# Altium PCB Transmitter_PCB.PcbDoc (part 3 of 3)
Units mil, origin at the board's own origin, x right, y up, seen from the top; angles counter-clockwise.
Board outline 1968.5 x 1968.5 mil, 2 copper layers (Top Layer, Bottom Layer), stack 57 mil thick; 93 components, 58 nets, 274 pads, 96 vias.
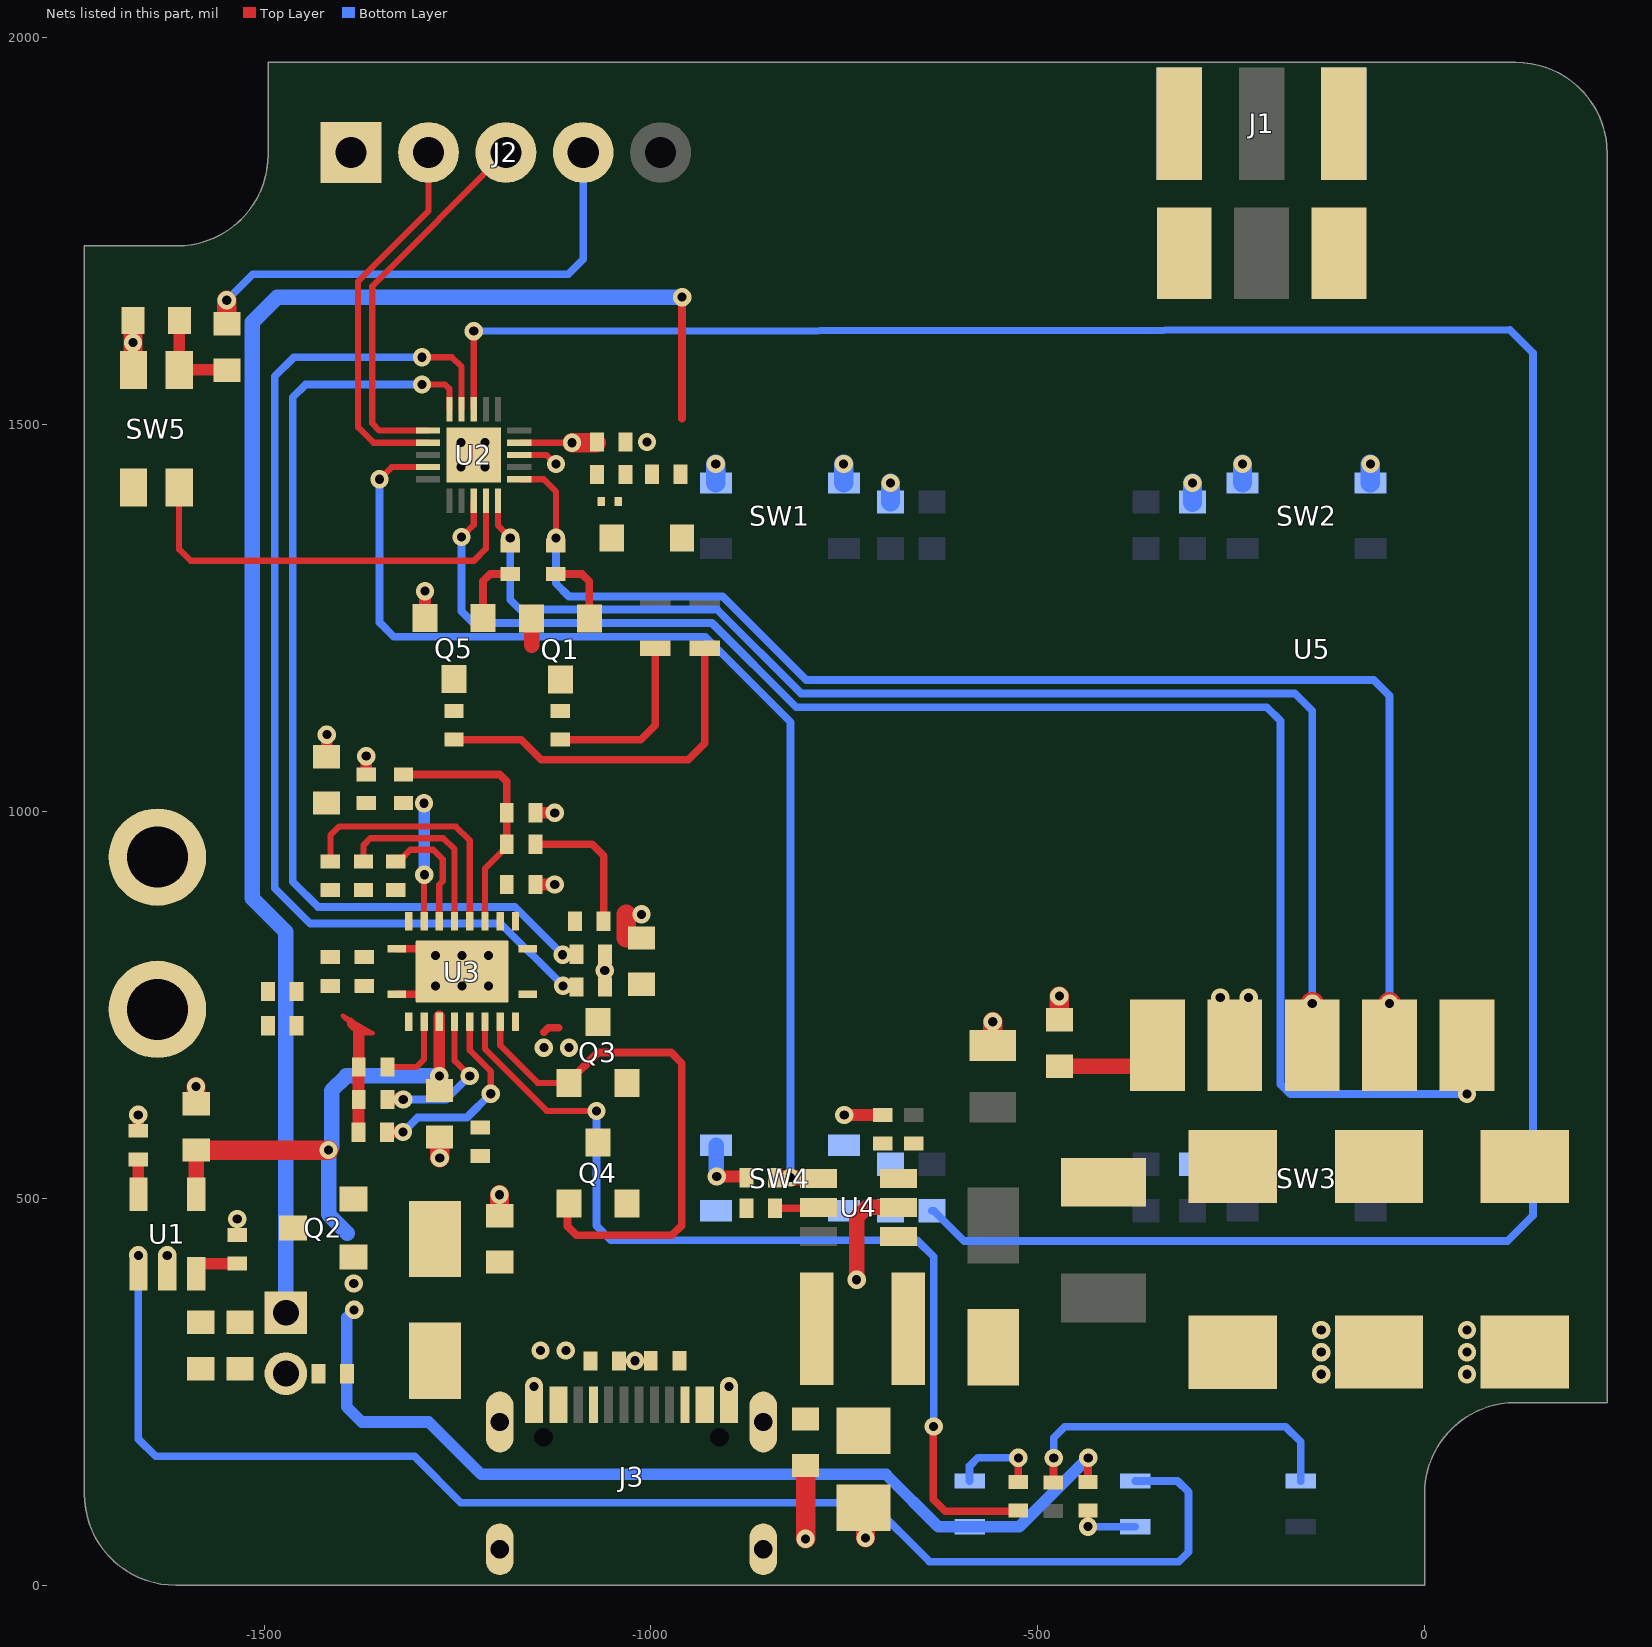
[diagram p2: the nets of this part, all layers, seen from the top]

## Via types
v1: diameter 23.62, hole 11.81, Top Layer to Bottom Layer, 96 vias

## Nets (pads, with @x,y where several pads share a name; then routed paths per layer and width w, separated by ;. In a path a pad name is that pad's centre, name@x,y a point inside that pad or via, vN(x,y) a via of type N, cw(c..) or ccw(c..) an arc to the next point about the centre after c; other vN are vias at no path point) (continued)
BUTTON4: C9.1 R5.2 SW4.1 SW4.2 U2.8 | length 3404.3
  Top Layer w8: U2.8@-1228.95,1520.1 v1(-1229,1621)
  Bottom Layer w10: v1(-1229,1621) 110.26,1622.79 140.36,1592.69 140.36,478.11 107.15,444.9 -594.95,444.9 -634.14,484.1 R5.2@-636.64,484.1
EN: R16.2 U2.14 U4.4 | length 1479.9
  Top Layer w6: U4.4@-784.17,526.83 U4.4@-783.17,525.83
  Top Layer w8: v1(-1350.78,1429.55) -1335.03,1445.29 U2.14@-1288.01,1445.29
  Top Layer w20: R16.2@-835.04,526.83 U4.4@-784.17,526.83
  Bottom Layer w10: v1(-1350.78,1429.55) -1350.78,1244.58 -1332.18,1225.98 -929.71,1225.98 -819.38,1115.65 v1(-819.38,527.05)
EN1: R28.2 U2.9 U3.10 | length 1397.9
  Top Layer w8: v1(-1295.91,1587.38) -1257.19,1587.38 -1244.7,1574.89 U2.9@-1244.7,1520.1
  Bottom Layer w10: v1(-1295.91,1587.38) -1461.26,1587.38 -1486,1562.64 -1486,901.15 -1440.14,855.29 -1193.98,855.29 v1(-1113.44,774.75)
EN2: R27.1 U2.10 U3.11 | length 1251.8
  Top Layer w8: v1(-1295.91,1552) -1265.93,1552 -1260.45,1546.52 U2.10@-1260.45,1520.1
  Bottom Layer w10: v1(-1295.91,1552) -1446.3,1552 -1462.77,1535.53 -1462.77,909.36 -1430.21,876.8 -1175.77,876.8 v1(-1114.02,815.04)
GND: C1.2 C2.2 C3.1 C4.1 C5.2 C6.2 C7.2 C8.2 C9.2 C10.2 C11.1 C12.1 C13.1 C14.1 C15.1 C16.1 C17.1 C18.1 C19.1 C20.2 C27.1 C28.1 C33.1 C34.2 C35.2 J1.2 J1.3 J1.4 J1.5 J2.1 J3.A1/B12 J3.B1/A12 J4.2 Q1.2 Q5.2 R13.1 R14.1 R15.2 R16.1 R17.2 R19.1 R21.1 R24.1 R25.2 R27.2 R28.1 SW1.3 SW1.4 SW2.3 SW2.4 SW3.3 SW3.4 SW4.3 SW4.4 SW5.2 U1.2 U2.3 U2.21 U3.1 U3.20 U3.21 U4.2 U5.2 U5.7 U5.8 | length 1121.4
  Top Layer w6: U3.21@-1288.91,763.8 v1(-1278.14,774.56) ; U3.21@-1286.87,822.86 v1(-1278.14,814.13)
  Top Layer w8: U2.3@-1169.9,1461.04 -1135.07,1461.04 -1123.25,1449.23 v1(-1122.74,1449.23)
  Top Layer w10: R13.1@-1662.53,587.63 R13.1@-1662.4,587.5 ; U3.1@-1328.54,763.8 U3.21@-1288.91,763.8 ; U3.20@-1328.54,822.86 U3.21@-1286.87,822.86 ; R16.1@-877.14,527.33 R16.1@-876.64,526.83
  Top Layer w15: R13.1@-1662.53,587.63 v1(-1662.53,608.05) ; R13.1@-1662.4,587.5 R13.1@-1662.35,587.55 ; v1(-1625.06,426.49) -1625,426.42 -1625,406 U1.2@-1624.94,405.94 ; v1(-1588.06,644.49) v1@-1588,644.42 ; v1(-1534.64,473.3) v1@-1534.58,473.24 ; C13.1@-1534.58,452.82 C13.1@-1534.51,452.75 ; C27.1@-1418.99,1070.96 -1418.89,1071.06 -1418.89,1099.41 v1(-1418.8,1099.51) ; C28.1@-1367.99,1048 C28.1@-1367.99,1048 v1@-1367.96,1071.64 ; Q5.2@-1291.89,1250.45 v1(-1291.89,1285) ; v1(-1272.95,552.38) v1(-1272.95,552.38) ; Q1.2@-1154.5,1247.3 Q1.2@-1154.15,1246.95 ; -1154.15,1214.93 -1153.89,1214.68 ; R25.2@-1149.29,905.73 v1(-1124.29,905.73) ; R24.1@-1149.29,998.37 v1(-1124.29,998.37) ; v1(-914.92,528.33) -877.16,528.33 -876.65,527.82 R16.1@-877.14,527.33 ; v1(-750,607.9) R19.1@-700.36,607.9 ; v1@-722.6,61.08 v1(-722.53,61.01) ; v1@-1367.96,1071.64 v1(-1367.92,1071.67)
  Top Layer w20: -1154.15,1214.93 Q1.2@-1154.15,1246.95 ; v1(-734,395) -734,475.14 -720.72,488.42 U4.2@-680.02,488.42
  Top Layer w25: C6.2@-1669.24,1634.63 C6.2@-1669.24,1634.63 -1669.32,1571.12 SW5.2@-1668.77,1570.57 ; C11.1@-1588,624 v1@-1588,644.42 ; v1(-1272.95,552.38) C17.1@-1273.02,572.87 ; C19.1@-1195.68,484.24 v1@-1195.68,504.66 ; -1031.97,836.73 -1031.97,867.2 ; v1(-800,60) -800,152.5 R21.1@-799.6,152.5 ; v1@-722.6,61.08 C16.1@-722.6,81.5 ; C15.1@-558.08,697.9 v1(-558.08,728.37) ; C1.2@-472,731 v1(-472,761.47)
  Bottom Layer w10: SW1.3@-916.17,1425.08 SW1.3@-915.84,1424.74 ; SW4.3@-915.85,568.74 SW4.3@-915.58,569.01 ; SW1.4@-750.81,1425.08 SW1.4@-750.48,1424.74 ; C5.2@-690.33,1400.43 C5.2@-690,1400.1 ; SW2.3@-235.3,1425.08 SW2.3@-234.97,1424.74 ; SW2.4@-69.94,1425.08 SW2.4@-69.61,1424.74
  Bottom Layer w20: SW4.3@-915.58,569.01 -915.27,568.7 -915.27,528.69 v1(-914.92,528.33)
  Bottom Layer w25: SW1.3@-916.17,1425.08 v1(-916.17,1449.39) ; SW1.4@-750.81,1425.08 v1(-750.81,1449.39) ; C5.2@-690.33,1400.43 v1(-690.33,1424.74) ; C7.2@-300,1400.1 v1@-300,1424.41 ; SW2.3@-235.3,1425.08 v1(-235.3,1449.39) ; SW2.4@-69.94,1425.08 v1(-69.94,1449.39)
  other v1: -1150.98,257.13 -899.02,257.13 -133.41,272.75 55,272.75 -1020.53,290.25 -133.41,301.38 55,301.38 -133.41,330 55,330 -1195.74,504.73 -264,759.64 -227.38,759.64 -1243.89,774.56 -1209.64,774.56 -1059.59,794.68 -1243.89,814.13 -1209.64,814.13 -1011.97,867.2 -300,1424.74 -1245.46,1445.29 -1214.21,1445.29 -1245.46,1476.92 -1214.21,1476.92 -1005.1,1477.81 -1669.32,1606.15
ILIM: R18.2 R23.2 R24.2 U3.14 | length 329.9
  Top Layer w8: U3.14@-1214.36,858.29 -1214.36,926.64 R23.2@-1190.84,950.16
  Top Layer w10: R18.2@-1319.68,1048 -1195.29,1048 -1186.29,1039 R24.2@-1186.29,998.37 R23.2@-1186.29,957.66 R23.2@-1186.29,954.16 ; R23.2@-1190.84,950.16 -1190.29,950.16 -1186.57,953.89 R23.2@-1186.57,954.44
NetC1_1: C1.1 C10.1 C34.1 C35.1 D3.1 U5.1 | length 138.1
  Top Layer w10: U5.1@-372.38,671 U5.1@-345.2,698.18
  Top Layer w20: C1.1@-472,671 U5.1@-372.38,671
NetC3_2: C3.2 C4.2 L1.2 U2.4 | length 100.7
  Top Layer w8: U2.4@-1169.9,1476.79 v1(-1102,1476.79)
  Top Layer w10: C3.2@-1070.6,1476.79 C3.2@-1069.58,1477.81
  Top Layer w25: v1(-1102,1476.79) C3.2@-1070.6,1476.79
NetC16_2: C16.2 J3.S1 J3.S2 J3.S3 J3.S4 R21.2
NetC21_1: C21.1 C22.1 C23.1 C24.2 C25.2 C26.2 C32.2 U3.2 | length 227.6
  Top Layer w6: -1387.57,730.84 -1387.57,725.45 -1398.26,736.14 -1387.98,730.14 -1384.48,728.09 -1359.38,713.43 -1374.89,713.43 -1376.7,711.62
  Top Layer w10: -1387.57,725.45 -1377.59,715.47
  Top Layer w15: C22.1@-1377.88,585.6 -1377.88,627.8 C23.1@-1377.88,669.84 ; C23.1@-1377.59,669.84 -1377.59,715.47
NetC21_2: C21.2 U3.5 | length 197.5
  Top Layer w8: U3.5@-1253.73,728.37 -1253.73,678.05 v1(-1234.05,658.37)
  Top Layer w10: C21.2@-1340.64,627.85 C21.2@-1340.51,627.98
  Top Layer w15: C21.2@-1340.64,627.85 C21.2@-1340.59,627.8 ; C21.2@-1340.51,627.98 v1(-1320.09,627.98)
  Bottom Layer w10: v1(-1320.09,627.98) -1264.44,627.98 v1(-1234.05,658.37)
NetC22_2: C22.2 U3.6 | length 258.9
  Top Layer w8: U3.6@-1234.05,728.37 -1234.05,691.27 -1206.97,664.19 v1(-1206.97,635.33)
  Top Layer w10: C22.2@-1340.94,585.65 C22.2@-1340.81,585.78
  Top Layer w15: C22.2@-1340.94,585.65 C22.2@-1340.88,585.6 ; C22.2@-1340.81,585.78 v1(-1320.39,585.78)
  Bottom Layer w10: v1(-1320.39,585.78) -1301.55,604.61 -1237.69,604.61 v1(-1206.97,635.33)
NetC23_2: C23.2 U3.3 | length 102.5
  Top Layer w8: C23.2@-1342.86,669.84 -1302.97,669.84 -1293.1,679.7 U3.3@-1293.1,728.37
NetC24_1: C24.1 C25.1 L3.2
NetC26_1: C26.1 C29.1 C30.1 C31.1 C32.1 L3.1 U3.19
NetC29_2: C29.2 U3.17 | length 153.9
  Top Layer w8: C29.2@-1329.68,935.54 -1324.68,940.54 -1321.02,940.54 -1310.93,950.63 -1281.2,950.63 -1269.09,938.51 -1269.09,909.89 -1273.42,905.56 U3.17@-1273.42,858.29
NetC30_2: C30.2 U3.15 | length 330.6
  Top Layer w8: C30.2@-1414.27,935.54 -1414.27,969.49 -1403.13,980.63 -1251.99,980.63 -1234.05,962.69 U3.15@-1234.05,858.29
NetC31_2: C31.2 U3.16 | length 241.4
  Top Layer w8: C31.2@-1371.42,935.54 -1371.42,956.76 -1362.55,965.63 -1268.3,965.63 -1253.73,951.06 U3.16@-1253.73,858.29
NetD1_2: D1.2 L2.2 U4.1
NetD4_1: D4.1 L1.1
NetJ3_A5: J3.A5 R15.1
NetJ3_B5: J3.B5 R17.1
NetLED1_2: LED1.2 R9.1 | length 229.9
  Top Layer w10: R9.1@-1117,1093 -1012.94,1093 -994.44,1111.5 LED1.2@-994.44,1211.16
NetLED2_1: LED2.1 R10.1 | length 81.7
  Top Layer w10: v1(-435,75.78) R10.1@-435,96.5
  Bottom Layer w10: v1(-435,75.78) LED2.1@-374,75.79
NetLED2_2: LED2.2 U1.1 | length 1838.7
  Top Layer w15: v1(-1662.47,426.49) -1662.4,426.42 -1662.4,406 U1.1@-1662.34,405.94
  Bottom Layer w10: v1(-1662.47,426.49) -1662.47,189.04 -1640.06,166.63 -1305.55,166.63 -1245.69,106.77 -716.05,106.77 -639.75,30.47 -317.74,30.47 -305,43.21 -305,120.52 -319.33,134.84 LED2.2@-374,134.84
NetLED3_2: LED3.2 R26.1 | length 466.5
  Top Layer w10: R26.1@-1254.49,1093 -1167.55,1093 -1141.55,1067 -951.73,1067 -930.44,1088.29 LED3.2@-930.44,1211.16
NetLED4_2: LED4.2 R7.1 | length 441.8
  Top Layer w10: R7.1@-480,133 -479.62,133.38 -479.62,164.25 v1(-479.25,164.62)
  Bottom Layer w10: v1(-479.25,164.62) -479.25,190.75 -465,205 -179.69,205 -160,185.31 LED4.2@-160,134.84
NetLED5_2: LED5.2 R29.1 | length 117.9
  Top Layer w10: R29.1@-525,133.5 v1(-525,164.7)
  Bottom Layer w10: LED5.2@-588,134.84 -588,154.14 -577.44,164.7 v1(-525,164.7)
NetQ1_1: Q1.1 R6.1 | length 95.4
  Top Layer w10: R6.1@-1122.74,1307.15 -1089.09,1307.15 -1079.6,1297.66 Q1.1@-1079.6,1249.37
NetQ1_3: Q1.3 R9.2
NetQ3_1: Q3.1 Q4.1 U3.8 | length 706.6
  Top Layer w8: U3.8@-1194.68,728.37 -1194.68,697.88 -1146.12,649.33 Q3.1@-1105.77,649.33
  Top Layer w10: Q4.1@-1105.77,493.63 -1107.63,491.77 -1107.63,463.76 -1096.15,452.27 -972.78,452.27 -960,465.05 -960,674.87 -973.83,688.7 -1068.37,688.7 -1105.77,651.3 Q3.1@-1105.77,649.33
NetQ3_2: Q3.2 Q4.2
NetQ5_1: Q5.1 R12.1 | length 86.5
  Top Layer w10: Q5.1@-1217.09,1250.25 -1217.09,1297.67 -1207.61,1307.15 R12.1@-1181.9,1307.15
NetQ5_3: Q5.3 R26.2
NetR11_1: R11.1 R19.2 U4.3
NetR13_2: R13.2 U1.5 | length 45.3
  Top Layer w15: U1.5@-1662.4,505.18 R13.2@-1662.4,550.5
NetR22_1: R22.1 U3.12
NetR22_2: R22.2 R23.1 | length 181.3
  Top Layer w10: R23.1@-1149.29,957.66 -1075.79,957.66 -1060.97,942.84 R22.2@-1060.97,855.97
NetR25_1: R25.1 U3.13
POWER: R29.2 U3.7 | length 1243.7
  Top Layer w8: U3.7@-1214.36,728.37 -1214.36,693.01 -1134.53,613.18 v1(-1070.29,613.18)
  Top Layer w10: v1(-634.47,205.17) -635,204.64 -635,111.31 -619.44,95.75 -525.75,95.75 R29.2@-525,96.5
  Bottom Layer w10: v1(-1070.29,613.18) -1070.29,464.57 -1051.75,446.04 -656.01,446.04 -634.47,424.5 v1(-634.47,205.17)
RECT: C27.2 C28.2 R18.1 U3.18 | length 152.4
  Top Layer w8: U3.18@-1293.1,858.29 v1@-1293.1,918.14
  Bottom Layer w10: v1(-1293.1,1010.87) v1@-1292.93,1010.7 ; v1@-1292.93,918.65 v1(-1292.76,918.48)
  Bottom Layer w15: v1@-1292.93,918.65 v1@-1292.93,1010.7
RESET: C6.1 R2.2 SW5.1 U2.19 | length 678.4
  Top Layer w8: SW5.1@-1609.72,1419 -1609.72,1339.17 -1594.78,1324.24 -1228.6,1324.24 -1213.21,1339.63 U2.19@-1213.21,1401.99
  Top Layer w15: SW5.1@-1609.72,1570.57 C6.1@-1609.72,1634.16 ; SW5.1@-1609.24,1571.05 R2.2@-1545.66,1571.05
RESET#: J2.4 R2.1 | length 651.3
  Top Layer w25: R2.1@-1548.13,1630.49 v1(-1548.13,1660.96)
  Bottom Layer w10: v1(-1548.13,1660.96) -1514.46,1694.62 -1106.64,1694.62 -1087.37,1713.9 J2.4@-1087.37,1852
RX: R12.2 U2.20 U5.3 | length 1663.7
  Top Layer w8: U2.20@-1197.46,1401.99 -1197.46,1369.62 v1(-1181.71,1353.87)
  Top Layer w30: U5.3@-145.2,698.18 v1(-145.2,751.84)
  Bottom Layer w10: v1@-1181.71,1354.83 -1181.71,1273.83 -1168.98,1261.1 -914.25,1261.1 -805.93,1152.78 -167.79,1152.78 -145.2,1130.19 v1(-145.2,751.84)
RXD: J2.3 U2.11 | length 497.7
  Top Layer w8: U2.11@-1288.01,1492.54 -1350.78,1492.54 -1360.19,1501.95 -1360.19,1679.18 J2.3@-1187.37,1852
SET: U2.18 U5.5 | length 1982.8
  Top Layer w8: v1(-1244.7,1354.83) -1228.95,1370.58 U2.18@-1228.95,1401.99
  Bottom Layer w10: v1(-1244.7,1354.83) -1244.7,1258.85 -1229.62,1243.77 -920.96,1243.77 -812.19,1135 -203.88,1135 -186.09,1117.21 -186.09,647.71 -173.37,635 v1(55,635)
TX: R6.2 U2.1 U5.4 | length 1761.7
  Top Layer w8: U2.1@-1169.9,1429.55 -1138.49,1429.55 -1122.74,1413.8 v1(-1122.74,1353.87)
  Top Layer w30: U5.4@-45.2,698.18 v1(-45.2,751.84)
  Bottom Layer w10: v1(-1122.74,1353.87) -1122.74,1295.02 -1105.82,1278.1 -907.21,1278.1 -799.27,1170.16 -65.76,1170.16 -45.2,1149.6 v1(-45.2,751.84)
TXD: J2.2 U2.12 | length 491.7
  Top Layer w8: U2.12@-1288.01,1476.79 -1358.37,1476.79 -1378.5,1496.92 -1378.5,1685.24 -1287.37,1776.37 J2.2@-1287.37,1852
VBAT: C2.1 C12.2 C13.2 C33.2 D4.2 J4.1 Q2.3 U1.3 | length 2078.6
  Top Layer w10: -959.82,1507.98 -959.82,1664.71 v1(-959.53,1665)
  Top Layer w15: U1.3@-1587.6,415.82 C13.2@-1534.58,415.82
  Top Layer w25: D4.2@-960.61,1354.47 D4.2@-959.82,1353.68
  Bottom Layer w20: J4.1@-1471.79,352.25 -1471.79,844.65 -1515.03,887.89 -1515.03,1632.82 -1482.85,1665 v1(-959.53,1665)
VCC: C11.2 C17.2 C18.2 D2.2 LED5.1 Q2.1 Q4.3 R10.2 R14.2 U1.4 U3.4 | length 1882.7
  Top Layer w10: D2.2@-1295.75,273.51 D2.2@-1279,290.26 ; R10.2@-435,133.5 -434.85,133.64 -434.85,164.56 v1(-434.71,164.7)
  Top Layer w15: v1(-1273.42,658.37) U3.4@-1273.42,728.37 U3.4@-1273.42,735.72
  Top Layer w20: U1.4@-1587.6,505.18 C11.2@-1587.6,550.5
  Top Layer w25: C11.2@-1587.45,557.35 C11.2@-1582.31,562.5 ; C11.2@-1582.6,562.5 v1(-1416.55,562.5)
  Bottom Layer w15: v1(-1383.5,356) -1393.33,346.17 -1393.33,230.9 -1373.5,211.06 -1287.04,211.06 -1219.25,143.27 -695.99,143.27 -628.5,75.79 LED5.1@-588,75.79 -523.62,75.79 v1(-434.71,164.7)
  Bottom Layer w20: -1392.5,455.24 -1416.55,479.28 v1(-1416.55,562.5) -1412.54,566.51 -1412.54,639.4 -1393.57,658.37 v1(-1273.42,658.37)
  other v1: -1384.05,390.02
VCC#: C14.2 C19.2 D2.1 L2.1 Q2.2 U4.5 | length 98.7
  Top Layer w6: U4.5@-784.17,487.42 U4.5@-783.17,488.42
  Top Layer w10: D2.1@-1279,447.74 -1279,446.2 D2.1@-1250.54,417.74 ; C14.2@-839.64,487.42 U4.5@-784.17,487.42
VUSB: C20.1 J3.A4/B9 J3.B4/A9 Q3.3 U3.9 | length 21.4
  Top Layer w10: -1138.28,714.96 -1132.54,720.7 -1119.29,720.7
  other v1: -1142.6,303.57 -1109.9,303.57 -1138.28,694.96 -1105.77,694.96
pads on no net: J3.A6 J3.A7 J3.A8 J3.B6 J3.B7 J3.B8 J3.MH U2.2 U2.15 U2.16 U2.17 U4.6

## Polygon pours and split planes (outlines as drawn)
VUSB on Bottom Layer "VUSB_L02_P005" (solid, pour order 5): -1151.23,283.97 -1079.59,283.97 -1079.59,549.59 -1079.59,709.25 -1151.23,709.25
GND on Bottom Layer "GND_L02_P010" (solid, pour order 10): -1732.28,118.11 -1732.28,1731.28 -1614.5,1731.28 -1612.68,1731.28 ccw(c-1612.68,1849.39) -1494.57,1849.39 -1494.57,1968.5 118.11,1968.5 cw(c118.11,1850.39) 236.22,1850.39 236.22,236.22 119.94,236.22 118.11,236.22 ccw(c118.11,118.11) 0,118.11 0,0 -1614.17,0 cw(c-1614.17,118.11)
GND on Top Layer "GND_L01_P012" (solid, pour order 12): -1732.28,118.11 -1732.28,1731.28 -1614.5,1731.28 -1612.68,1731.28 ccw(c-1612.68,1849.39) -1494.57,1849.39 -1494.57,1968.5 118.11,1968.5 cw(c118.11,1850.39) 236.22,1850.39 236.22,236.22 119.94,236.22 118.11,236.22 ccw(c118.11,118.11) 0,118.11 0,0 -1614.17,0 cw(c-1614.17,118.11)
VUSB on Top Layer "VUSB_L01_P015" (solid, pour order 15): -1179.72,746.18 -994.47,746.18 -994.47,679.7 -1179.72,679.7
VCC on Top Layer "VCC_L01_P014" (solid, pour order 14): -1290.92,674.87 -1052.23,674.87 -1052.23,554.6 -1290.92,554.6
+5V on Top Layer "+5V_L01_P013" (solid, pour order 13): -340.35,1405 -340.35,1445 -775,1445 -775,1891.37 -1030,1891.37 -1030,1812.63 -865,1812.63 -865,1284.69 -1014.12,1284.69 -1014.12,1243.77 -1011.03,1240.69 -672.85,1240.69 -672.85,607.9 -600,607.9 -600,1405
VUSB on Top Layer "VUSB_L01_P006" (solid, pour order 6): -1107.68,277.49 -1094.73,290.44 -1094.73,320 -1159,320 -1159,267.66 -1131.3,239.96 -1131.3,140.45 -1104.85,114 -946.51,114 -918.7,141.81 -918.7,257.13 -942.32,257.13 -942.32,174.69 -962.01,155 -1087.65,155 -1107.68,175.02
VCC on Top Layer "VCC_L01_P007" (solid, pour order 7): -1402.16,440.56 -1402.16,241.05 -1245.54,241.05 -1245.54,339.47 -1365.94,339.47 -1365.94,440.56
NetC16_2 on Top Layer "NETC16_2_L01_P009" (solid, pour order 9): -1139.17,242.85 -1139.17,138.23 -1110.22,109.27 -945.64,109.27 -943.78,107.41 -911.56,139.62 -911.56,172.17 -910.83,172.91 -910.83,242.85 -854.72,242.85 -854.72,18.22 -1195.28,18.22 -1195.28,242.85
VCC# on Top Layer "VCC#_L01_P008" (solid, pour order 8): -847.93,500.63 -759.16,500.63 -759.16,258.59 -847.93,258.59
NetC26_1 on Top Layer "NETC26_1_L01_P004" (solid, pour order 4): -1467.07,907.54 -1467.07,1025.96 -1700.78,1025.96 -1700.78,827.58 -1467.07,827.58 -1467.07,802.83 -1364.29,802.83 -1364.29,907.54

## Other copper
Top Layer:
  rectangle net NetQ3_2: -1041.37,475.52 -979.34,667.44
  rectangle net EN2: -1132.54,802.58 -1087.29,828.12
  rectangle net EN1: -1132.54,760.87 -1087.29,786.93
  rectangle net EN1: -1171.06,758.53 -1087.29,771.03
  rectangle net EN2: -1171.06,815.62 -1087.29,828.12
  rectangle net NetR22_1: -1174.99,853.96 -1098.29,864.25
  rectangle net VUSB: -1029.47,709.96 -994.47,791.73
  rectangle net +5V: -590.87,465.17 -523.94,652.9
  rectangle net +5V: -672.85,597.9 -528.08,652.9
  rectangle net +5V: -590.87,380.95 -359.88,465.17
  rectangle net NetQ1_3: -1129.5,1121 -1104.5,1171.51
  rectangle net NetQ5_3: -1266.99,1121 -1241.99,1171.51
  rectangle net GND: -1041.58,1423.31 -989.5,1490.31
  region net VBAT: -975.57,1680 -975.57,1335.97 -944.07,1335.97 -944.07,1680
  region net NetD4_1: -1047.17,1406.72 -1047.17,1335.97 -1034.62,1335.97 -1034.62,1406.72
  region net NetC3_2: -1086.16,1490.31 -1086.16,1393.58 -1054.58,1393.58 -1054.58,1490.31
  rectangle net GND: -1681.93,1419 -1657.61,1571.05
  rectangle net RESET: -1622.87,1419 -1598.56,1571.05
  rectangle net GND: -885.64,474.92 -867.64,539.33
  rectangle net GND: -1471.79,261.01 -1420.5,286.01
  rectangle net VCC#: -1312.46,376 -817.5,432.74
  rectangle net NetD1_2: -704.04,258.59 -523.94,340.9
  rectangle net NetD1_2: -704.04,258.59 -645.69,463.23
  rectangle net NetR11_1: -704.04,513.62 -656.01,579.9
  rectangle net GND: -1050.03,277.5 -991.19,302.49
  rectangle net NetC21_1: -1467.07,710.72 -1357.79,783.83
  rectangle net NetC21_1: -1467.07,710.72 -1308.06,740.18
  rectangle net VCC#: -1402.16,456.42 -1245.54,515.36
  rectangle net VBAT: -1480.9,324.69 -1444.23,478.14
  rectangle net VUSB: -1179.72,709.96 -1014.83,746.18
  rectangle net NetC21_1: -1331.85,716.56 -1308.06,740.18
  rectangle net VBAT: -1599.41,325 -1541.55,424.82
  rectangle net VBAT: -1599.29,324.69 -1471.79,379.81
  rectangle net GND: -1546.47,443.82 -1522.9,473.3
  rectangle net GND: -1599.29,245.95 -1471.79,301.07
  rectangle net NetC16_2: -854.72,191.38 -690,230
  rectangle net GND: -280.63,670 -209.76,779.4
  rectangle net GND: -304.81,254.13 186.73,348.5
  rectangle net NetC1_1: -404,489.31 -309.76,737.55
  rectangle net NetC1_1: -470.12,486.41 186.73,588.78
  region net GND: -74.72,1957.9 -133.78,1957.9 -133.78,1662.75 -74.72,1662.75
  rectangle net GND: -345.98,1662.75 -287.32,1957.9
  rectangle net ANT: -230.78,1721.8 -190.39,1885.06
  rectangle net NetC26_1: -1334.64,846.48 -1308.06,907.54
  rectangle net NetC26_1: -1426.77,886.04 -1308.06,907.54
  rectangle net NetR25_1: -1199.4,846.48 -1189.95,918.23
  rectangle net NetC26_1: -1426.77,802.83 -1354.18,907.54
  region net RECT: -1436.49,1025.96 -1436.49,995.96 -1278.14,995.96 -1278.14,1025.96
  rectangle net NetJ3_A5: -1080.12,209.88 -1068.31,302.49
  rectangle net NetJ3_B5: -962.01,209.88 -950.2,302.5
  rectangle net NetC24_1: -1700.78,681.38 -1486.07,807.36
Bottom Layer:
  rectangle net VCC: -1430,324.69 -1355,585.78
  rectangle net BUTTON1: -936.52,1326.32 -636.64,1353.88
  region net BUTTON3: -60.12,497.88 -360,497.88 -360,470.32 -60.12,470.32
  rectangle net BUTTON4: -936.52,470.32 -636.64,497.88
  rectangle net BUTTON2: -377.5,1325.1 -48.94,1355.1

## Silkscreen, mask and mechanical layers (free items; w line width, h text height)
Top Overlay:
  lines w10: -1718.55,665 -1550,665 -1550,1025.96 -1718.55,1025.96 -1718.55,665
  text "3V3" at -1367.87,1730.16 h40 r90
  text "RST" at -1066.87,1722.76 h40 r90
  text "TXD" at -1267.87,1721.98 h40 r90
  text "RXD" at -1165.87,1719.84 h40 r90
  text "GND" at -966.87,1715 h40 r90
  text "RESET" at -1697.96,1336.72 h40
  text "RX" at -917.63,1109.21 h40 r90
  text "TX" at -976.63,1104.43 h40 r90
  text "COIL" at -1699.19,1045.79 h40
Bottom Overlay:
  text "B+" at -1383.3,304.97 h40
  text "B-" at -1382.83,263.35 h40
Draft and Dimension:
  drawing of 191 lines, arcs and shapes, not listed
  text "Layer" at -1719.26,4280 h60
  text "Name" at -1309.35,4280 h60
  text "Material" at -379.6,4280 h60
  text "Thickness" at 480.16,4280 h60
  text "Constant" at 1130,4280 h60
  text "Board Layer Stack" at 1699.86,4280 h60
  text "Top Overlay" at -1309.35,4160 h60
  text "Top Solder" at -1309.35,4040 h60
  text "Solder Resist" at -379.6,4040 h60
  text "3.00mil" at 480.16,4040 h60
  text "3.5" at 1130,4040 h60
  text "1" at -1719.26,3920 h60
  text "Top Layer" at -1309.35,3920 h60
  text "10.00mil" at 480.16,3920 h60
  text "Dielectric 1" at -1309.35,3800 h60
  text "FR-4" at -379.6,3800 h60
  text "37.00mil" at 480.16,3800 h60
  text "4.8" at 1130,3800 h60
  text "2" at -1719.26,3680 h60
  text "Bottom Layer" at -1309.35,3680 h60
  text "10.00mil" at 480.16,3680 h60
  text "Bottom Solder" at -1309.35,3560 h60
  text "Solder Resist" at -379.6,3560 h60
  text "3.00mil" at 480.16,3560 h60
  text "3.5" at 1130,3560 h60
  text "Bottom Overlay" at -1309.35,3440 h60
  text "Total board thickness:" at -1719.26,3320 h60
  text "63.00mil" at 480.16,3320 h60
Board Outline:
  lines w10: -1732.28,1731.28 -1732.28,118.11 ccw(c-1614.17,118.11) -1614.17,0 0,0 0,116.28 ; -1730.79,1731.28 -1614.5,1731.28 ; -1612.68,1731.28 ccw(c-1612.68,1849.39) -1494.57,1849.39 ; -1494.57,1851.22 -1494.57,1967.5 ; -1494.57,1968.5 118.11,1968.5 cw(c118.11,1850.39) 236.22,1850.39 236.22,236.22 119.94,236.22 ; 0,118.11 cw(c118.11,118.11) 118.11,236.22 ; -1486.06,90.87 cw(c-1446.69,90.87) -1446.69,130.24 -1335.43,130.24 cw(c-1335.43,90.87) -1296.06,90.87 cw(c-1335.43,90.87) -1335.43,51.5 -1446.69,51.5 cw(c-1446.69,90.87) -1486.06,90.87 ; -654.96,1879.14 ccw(c-615.59,1879.14) -615.59,1839.77 -504.33,1839.77 ccw(c-504.33,1879.14) -464.96,1879.14 ccw(c-504.33,1879.14) -504.33,1918.51 -615.59,1918.51 ccw(c-615.59,1879.14) -654.96,1879.14 ; -78.74,0 -78.74,0
Drill Drawing:
  circle w10: c1405.62,2047.28 r33.33
  lines w10: 1372.29,2163.94 1438.96,2163.94 1438.96,2230.61 1372.29,2230.61 1372.29,2163.94 ; 1372.29,2380.61 1438.96,2380.61 1405.62,2313.94 1372.29,2380.61 ; 1372.29,2463.94 1405.62,2480.61 1438.96,2463.94 1422.29,2497.28 1438.96,2530.61 1405.62,2513.94 1372.29,2530.61 1388.96,2497.28 1372.29,2463.94 ; 1372.29,2630.61 1388.96,2630.61 1405.62,2613.94 1422.29,2630.61 1438.96,2630.61 1422.29,2647.28 1438.96,2663.94 1422.29,2663.94 1405.62,2680.61 1388.96,2663.94 1372.29,2663.94 1388.96,2647.28 1372.29,2630.61 ; 1372.29,2780.61 1388.96,2780.61 1388.96,2763.94 1422.29,2763.94 1422.29,2780.61 1438.96,2780.61 1438.96,2813.94 1422.29,2813.94 1422.29,2830.61 1388.96,2830.61 1388.96,2813.94 1372.29,2813.94 1372.29,2780.61 ; 1372.29,2913.94 1372.29,2930.61 1388.96,2947.28 1372.29,2963.94 1372.29,2980.61 1388.96,2980.61 1405.62,2963.94 1422.29,2980.61 1438.96,2980.61 1438.96,2963.94 1422.29,2947.28 1438.96,2930.61 1438.96,2913.94 1422.29,2913.94 1405.62,2930.61 1388.96,2913.94 1372.29,2913.94
  lines w15: 1312.5,1968.94 12263.44,1968.94 ; 1312.5,3018.94 12263.44,3018.94 ; 1863.38,1818.94 1863.38,3168.94 ; 2433.23,1818.94 2433.23,3168.94 ; 3532.91,1818.94 3532.91,3168.94 ; 4038.78,1818.94 4038.78,3168.94 ; 4772.58,1818.94 4772.58,3168.94 ; 6272.13,1818.94 6272.13,3168.94 ; 6861.98,1818.94 6861.98,3168.94 ; 7607.78,1818.94 7607.78,3168.94 ; 8697.46,1818.94 8697.46,3168.94 ; 9551.23,1818.94 9551.23,3168.94 ; 10884.84,1818.94 10884.84,3168.94 ; 1312.5,1818.94 12263.44,1818.94 12263.44,3168.94 1312.5,3168.94 1312.5,1818.94
  text "Symbol" at 1402.5,3063.94 h72
  text "Count" at 1908.38,3063.94 h72
  text "Hole Size" at 2478.23,3063.94 h72
  text "Plated" at 3577.91,3063.94 h72
  text "Hole Type" at 4083.78,3063.94 h72
  text "Drill Layer Pair" at 4817.58,3063.94 h72
  text "Via/Pad" at 6317.13,3063.94 h72
  text "Pad Shape" at 6906.98,3063.94 h72
  text "Template" at 7652.78,3063.94 h72
  text "Description" at 8742.46,3063.94 h72
  text "Hole Tolerance (+)" at 9596.23,3063.94 h72
  text "Hole Tolerance (-)" at 10929.84,3063.94 h72
  text "2" at 1908.38,2913.94 h60
  text "23.62mil (0.600mm)" at 2478.23,2913.94 h60
  text "PTH" at 3577.91,2913.94 h60
  text "Slot" at 4083.78,2913.94 h60
  text "Top Layer - Bottom Layer" at 4817.58,2913.94 h60
  text "Pad" at 6317.13,2913.94 h60
  text "Rounded" at 6906.98,2913.94 h60
  text "r90_170h60_140r45" at 7652.78,2913.94 h60
  text "2" at 1908.38,2763.94 h60
  text "23.62mil (0.600mm)" at 2478.23,2763.94 h60
  text "PTH" at 3577.91,2763.94 h60
  text "Slot" at 4083.78,2763.94 h60
  text "Top Layer - Bottom Layer" at 4817.58,2763.94 h60
  text "Pad" at 6317.13,2763.94 h60
  text "Rounded" at 6906.98,2763.94 h60
  text "(Mixed)" at 7652.78,2763.94 h60
  text "2" at 1908.38,2613.94 h60
  text "24.41mil (0.620mm)" at 2478.23,2613.94 h60
  text "NPTH" at 3577.91,2613.94 h60
  text "Round" at 4083.78,2613.94 h60
  text "Top Layer - Bottom Layer" at 4817.58,2613.94 h60
  text "Pad" at 6317.13,2613.94 h60
  text "Rounded" at 6906.98,2613.94 h60
  text "c0hn62" at 7652.78,2613.94 h60
  text "2" at 1908.38,2463.94 h60
  text "33.46mil (0.850mm)" at 2478.23,2463.94 h60
  text "PTH" at 3577.91,2463.94 h60
  text "Round" at 4083.78,2463.94 h60
  text "Top Layer - Bottom Layer" at 4817.58,2463.94 h60
  text "Pad" at 6317.13,2463.94 h60
  text "(Mixed)" at 6906.98,2463.94 h60
  text "(Mixed)" at 7652.78,2463.94 h60
  text "2" at 1908.38,2313.94 h60
  text "78.74mil (2.000mm)" at 2478.23,2313.94 h60
  text "PTH" at 3577.91,2313.94 h60
  text "Round" at 4083.78,2313.94 h60
  text "Top Layer - Bottom Layer" at 4817.58,2313.94 h60
  text "Pad" at 6317.13,2313.94 h60
  text "Rounded" at 6906.98,2313.94 h60
  text "(Mixed)" at 7652.78,2313.94 h60
  text "5" at 1908.38,2163.94 h60
  text "40.16mil (1.020mm)" at 2478.23,2163.94 h60
  text "PTH" at 3577.91,2163.94 h60
  text "Round" at 4083.78,2163.94 h60
  text "Top Layer - Bottom Layer" at 4817.58,2163.94 h60
  text "Pad" at 6317.13,2163.94 h60
  text "(Mixed)" at 6906.98,2163.94 h60
  text "(Mixed)" at 7652.78,2163.94 h60
  text "96" at 1908.38,2013.94 h60
  text "11.81mil (0.300mm)" at 2478.23,2013.94 h60
  text "PTH" at 3577.91,2013.94 h60
  text "Round" at 4083.78,2013.94 h60
  text "Top Layer - Bottom Layer" at 4817.58,2013.94 h60
  text "Via" at 6317.13,2013.94 h60
  text "Rounded" at 6906.98,2013.94 h60
  text "v60h30" at 7652.78,2013.94 h60
  text "111 Total" at 1908.38,1863.94 h60
  text "Slot definitions :" at 1402.5,1718.97 h60
  text "Routed Path Length" at 2435.19,1718.97 h60
  text "= Calculated from tool start centre position to tool end centre position." at 3537.86,1718.97 h60
  text "Hole Length" at 2435.19,1618.99 h60
  text "= Routed Path Length + Tool Size = Slot length as defined in the PCB layout" at 3127.99,1618.99 h60

## Dimensions
0,0 to 118.11,1968.5 on Draft and Dimension
-1730.79,1731.28 to 236.22,1850.39 on Draft and Dimension

## Text inside footprints (layer, text, board x,y; h text height)
J3: Mechanical 13 "PCB Edge" at -1077.69,23.56 h40
U5: Top Overlay "8" at -94.61,1603.87 h39.37 r90; Top Overlay "7" at -293.61,1611.75 h39.37 r90; Top Overlay "6" at -196.61,1603.87 h39.37 r90; Top Overlay "5" at 73.95,761.15 h39.37 r90; Top Overlay "4" at -31.61,762.87 h39.37 r90; Top Overlay "3" at -127.61,761.87 h39.37 r90; Top Overlay "2" at -229.61,762.87 h39.37 r90; Top Overlay "1" at -329.67,770.82 h39.37 r90